# Altium PCB PCB DSI to DSI Adapter Rev-0.00.PcbDoc
Units mm, origin at the board's own origin, x right, y up, seen from the top; angles counter-clockwise.
Board outline 35.2 x 40.2 mm, 4 copper layers (Top Layer, GND, POWER, Bottom Layer), stack 1.555 mm thick; 63 components, 45 nets, 263 pads, 94 vias.
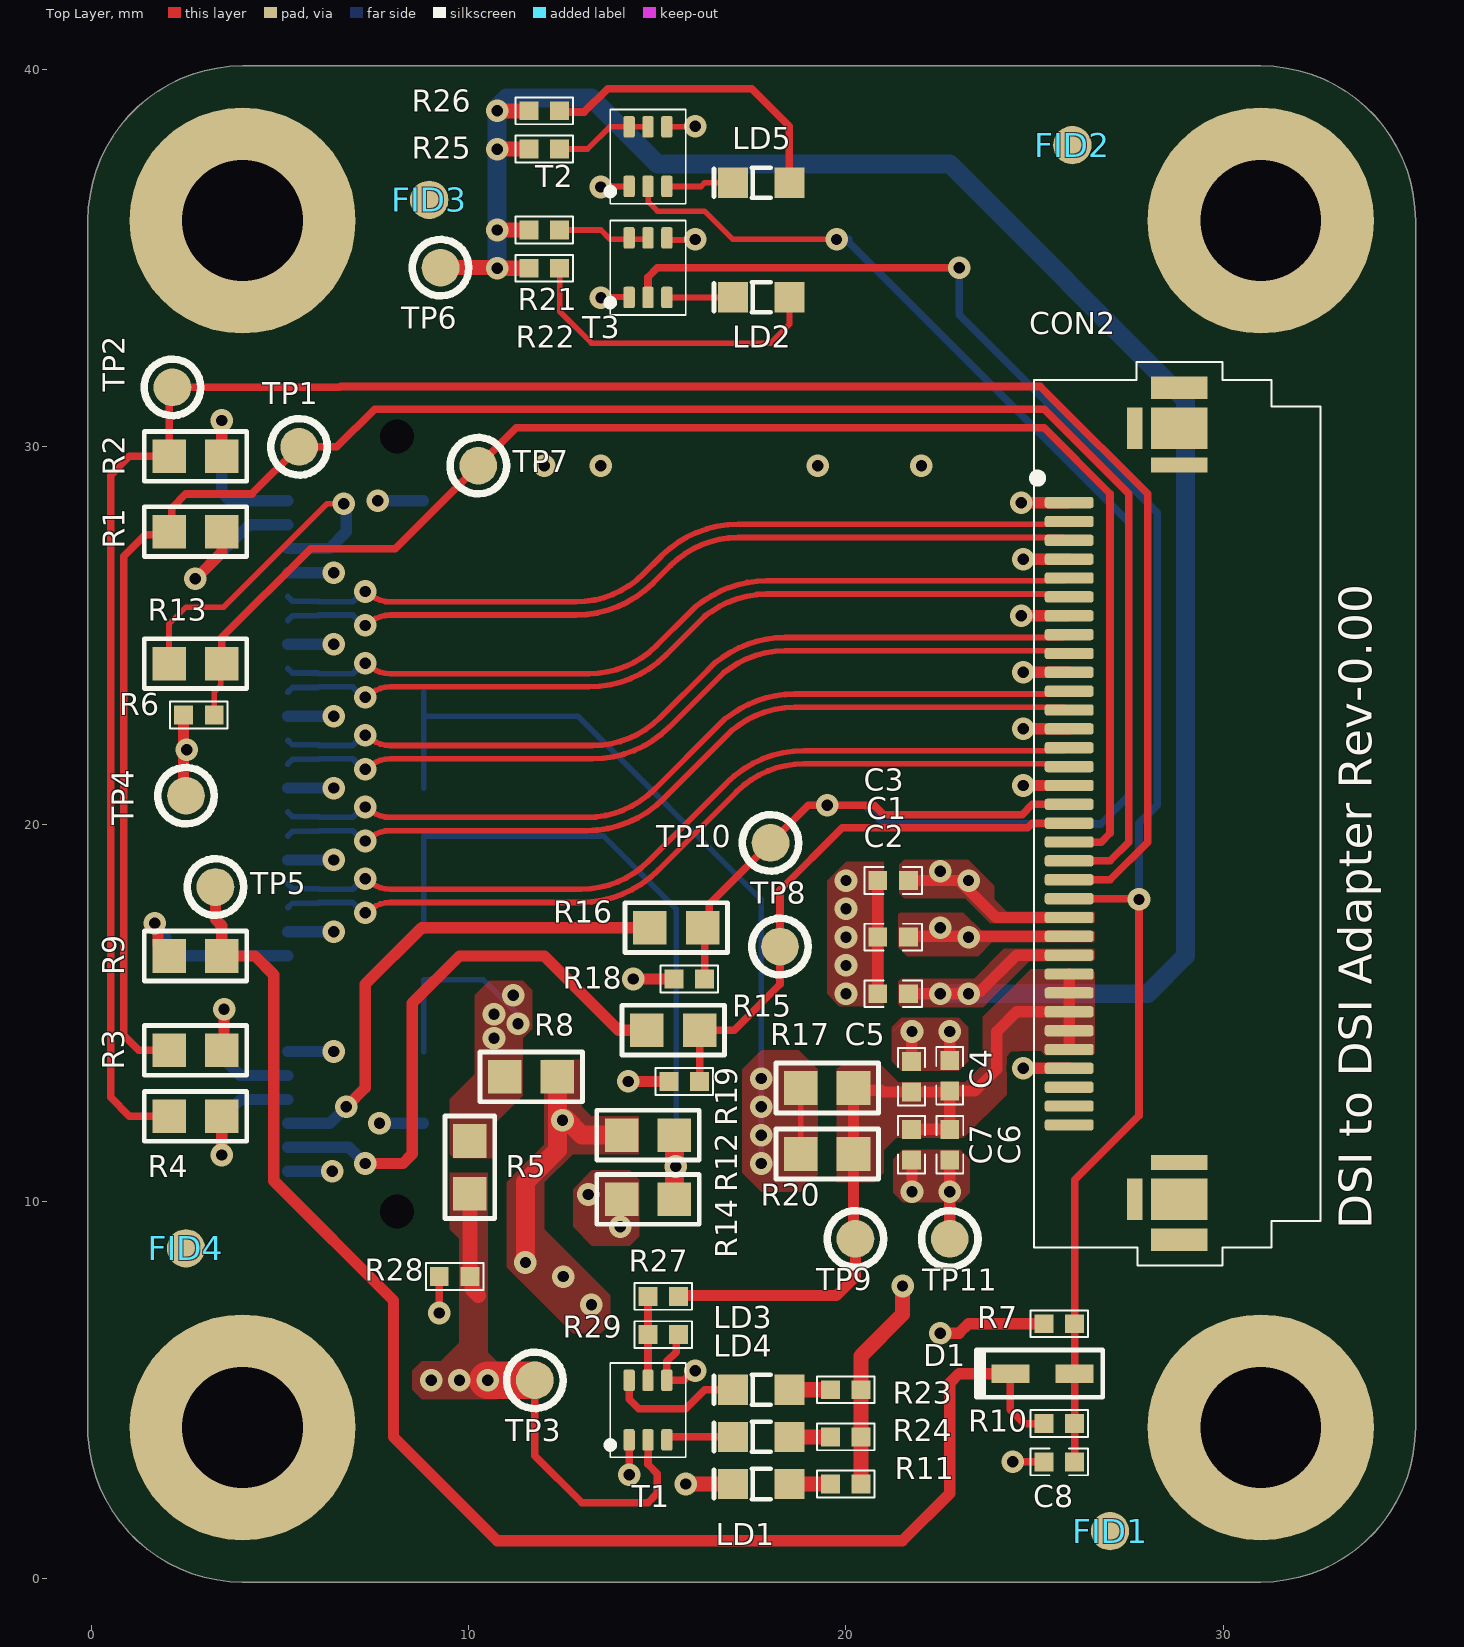
[diagram p0: Top Layer view]
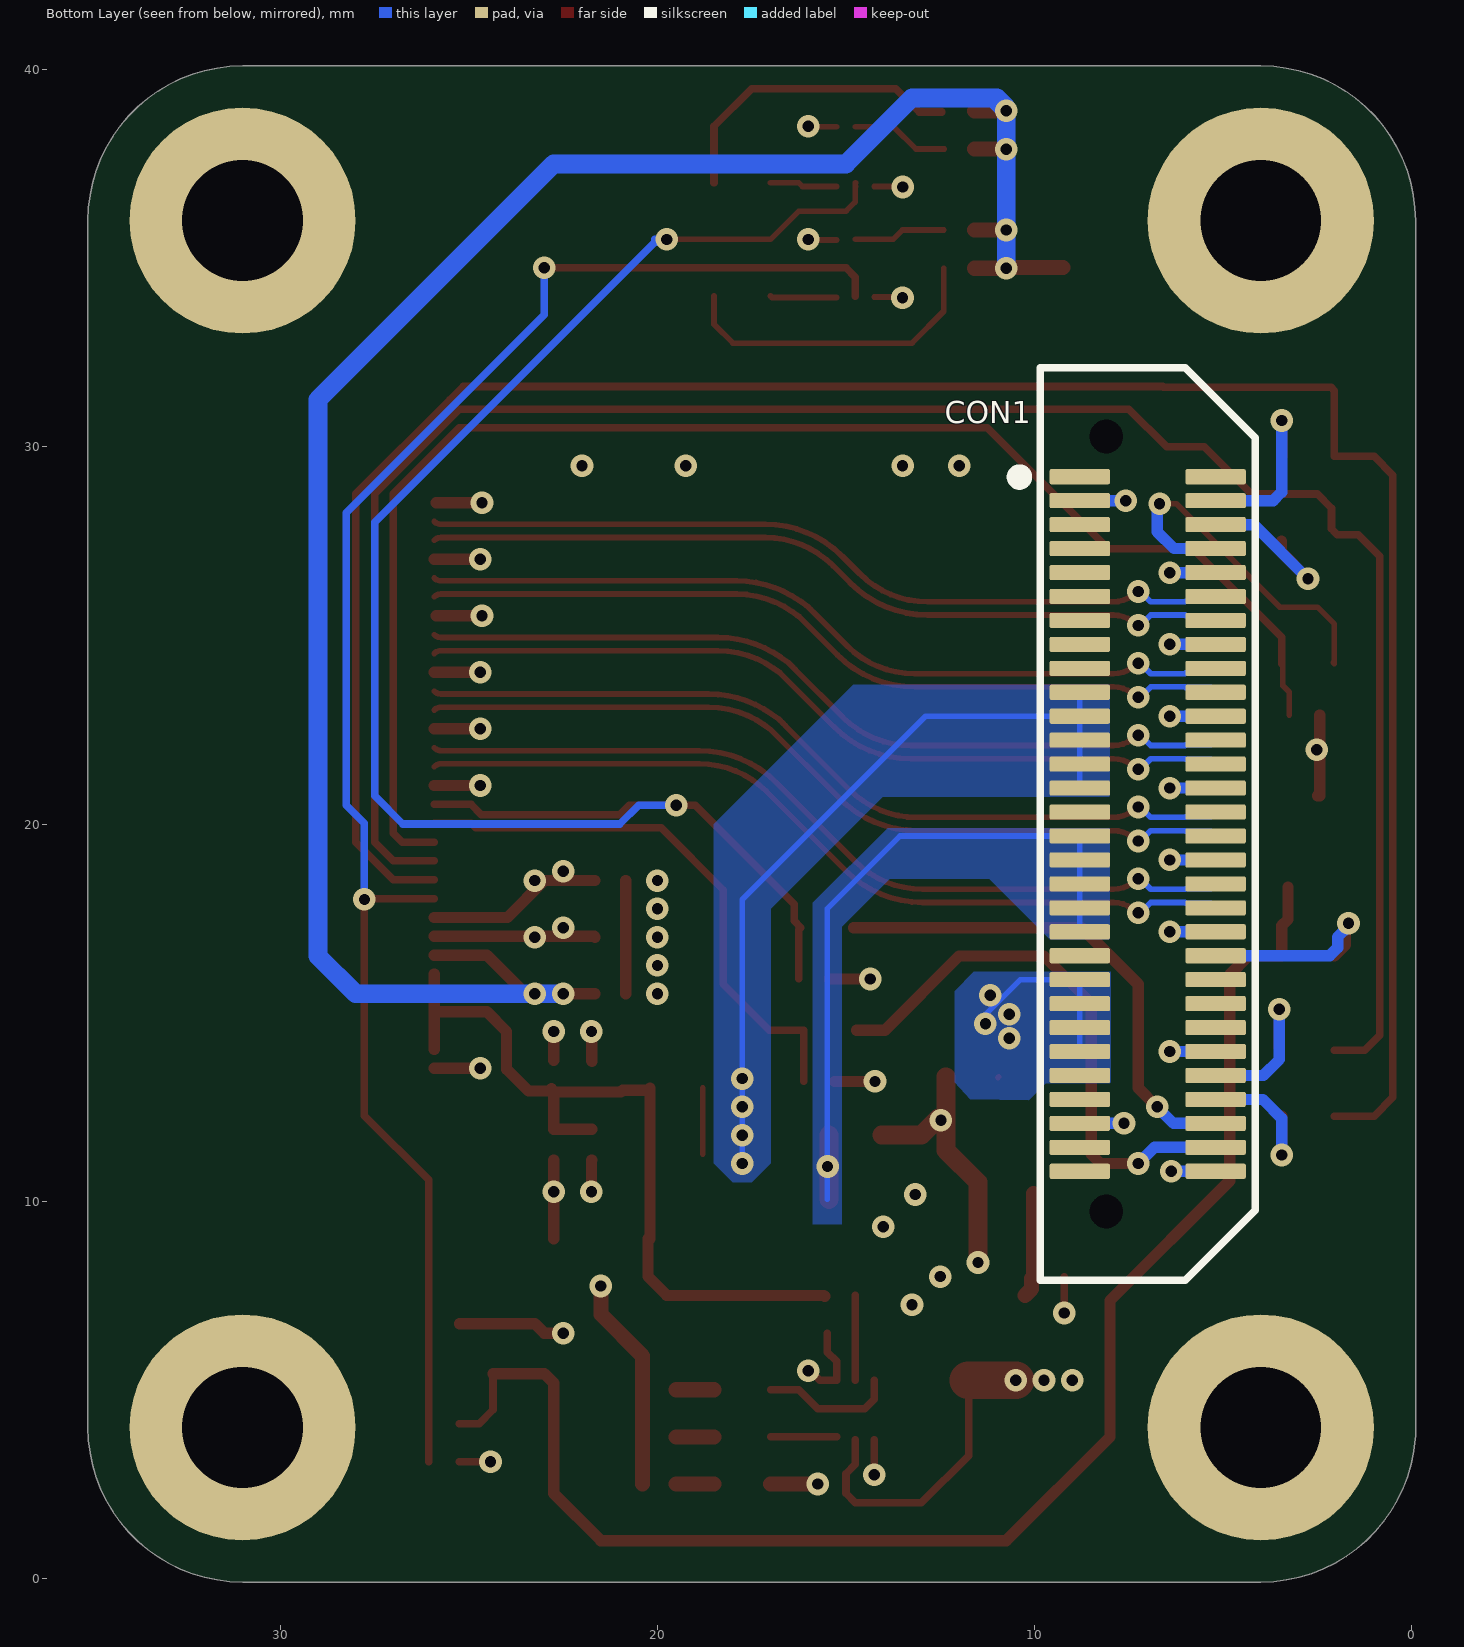
[diagram p1: Bottom Layer view, seen from below]
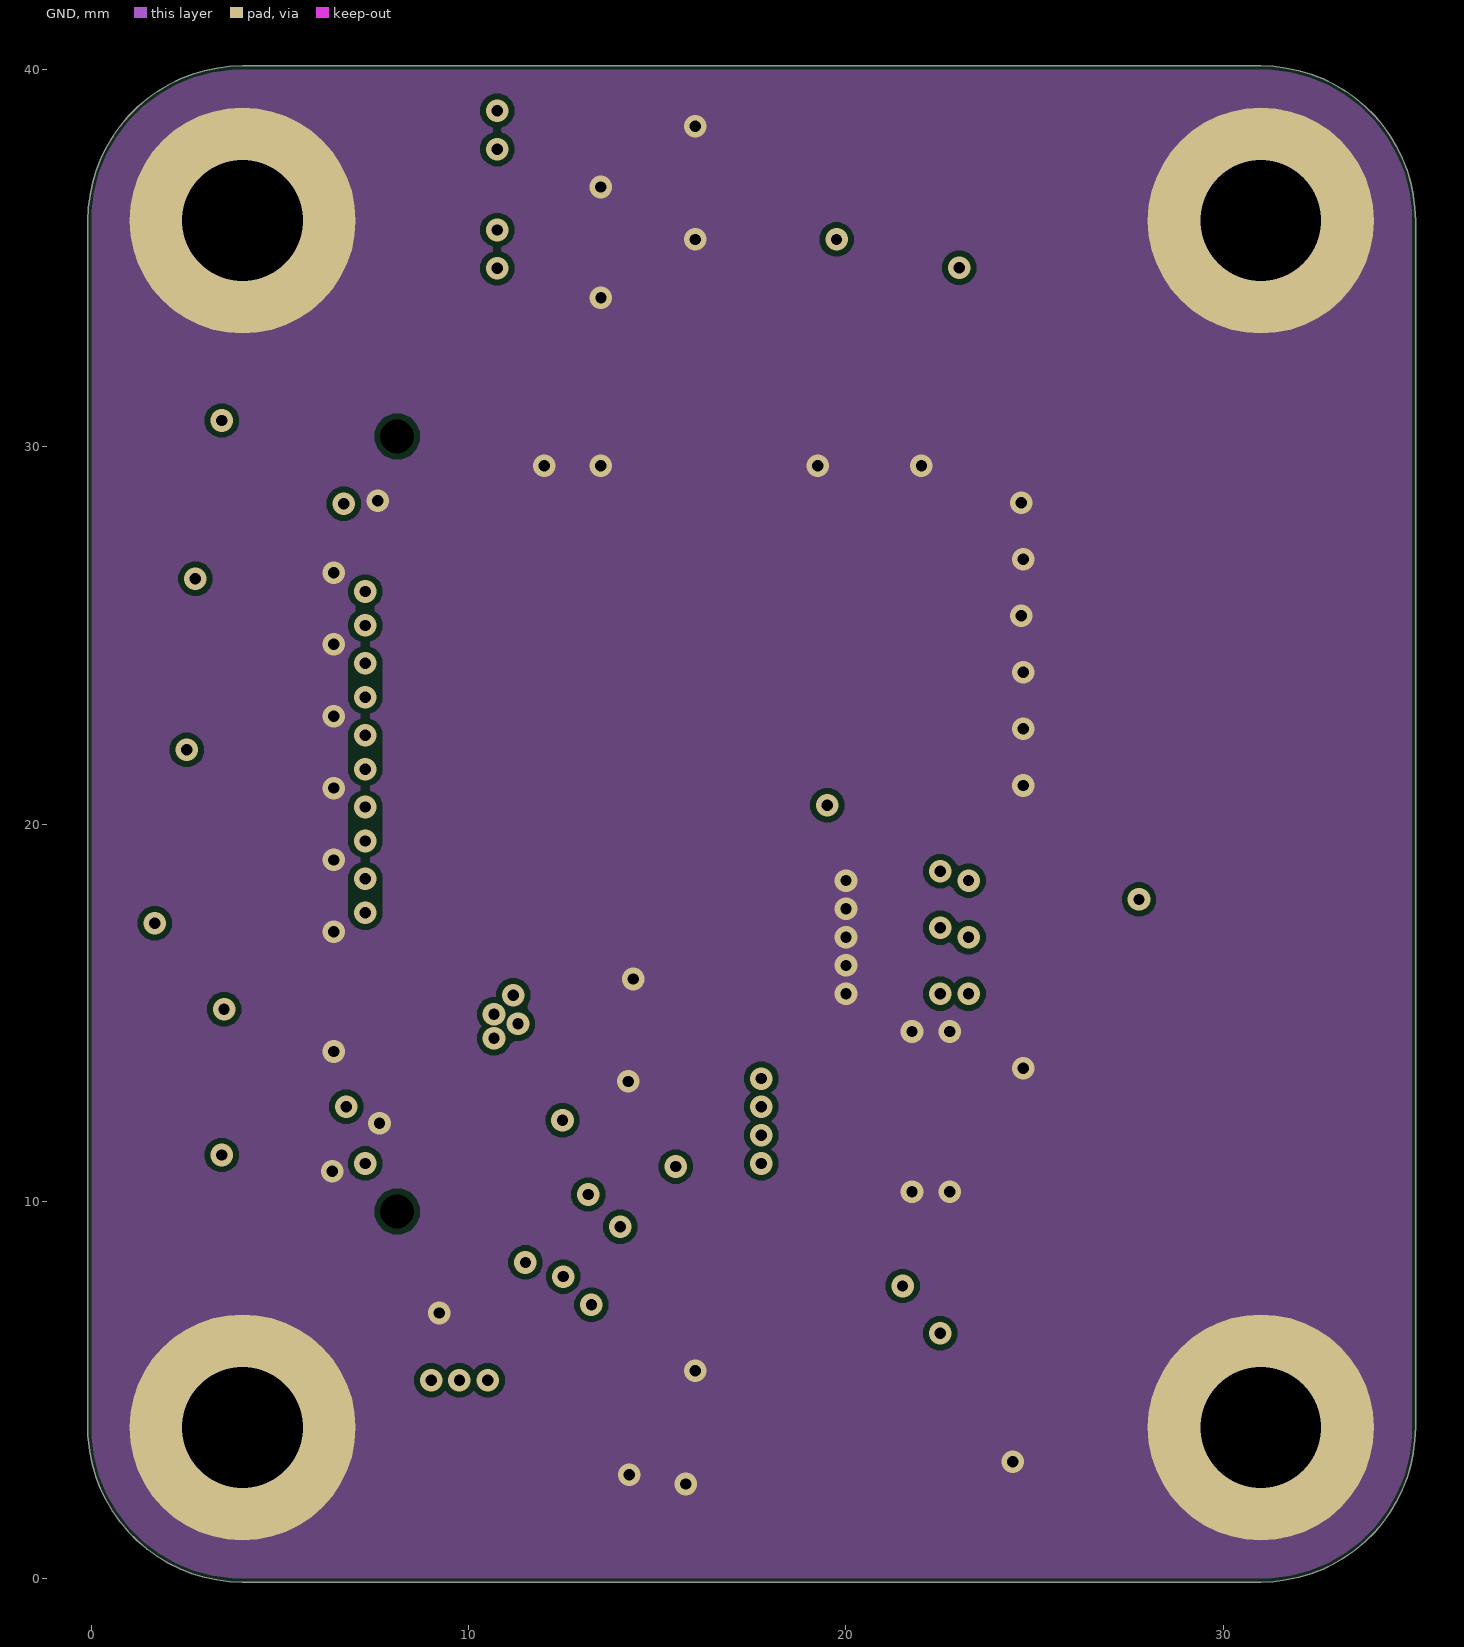
[diagram p2: GND]
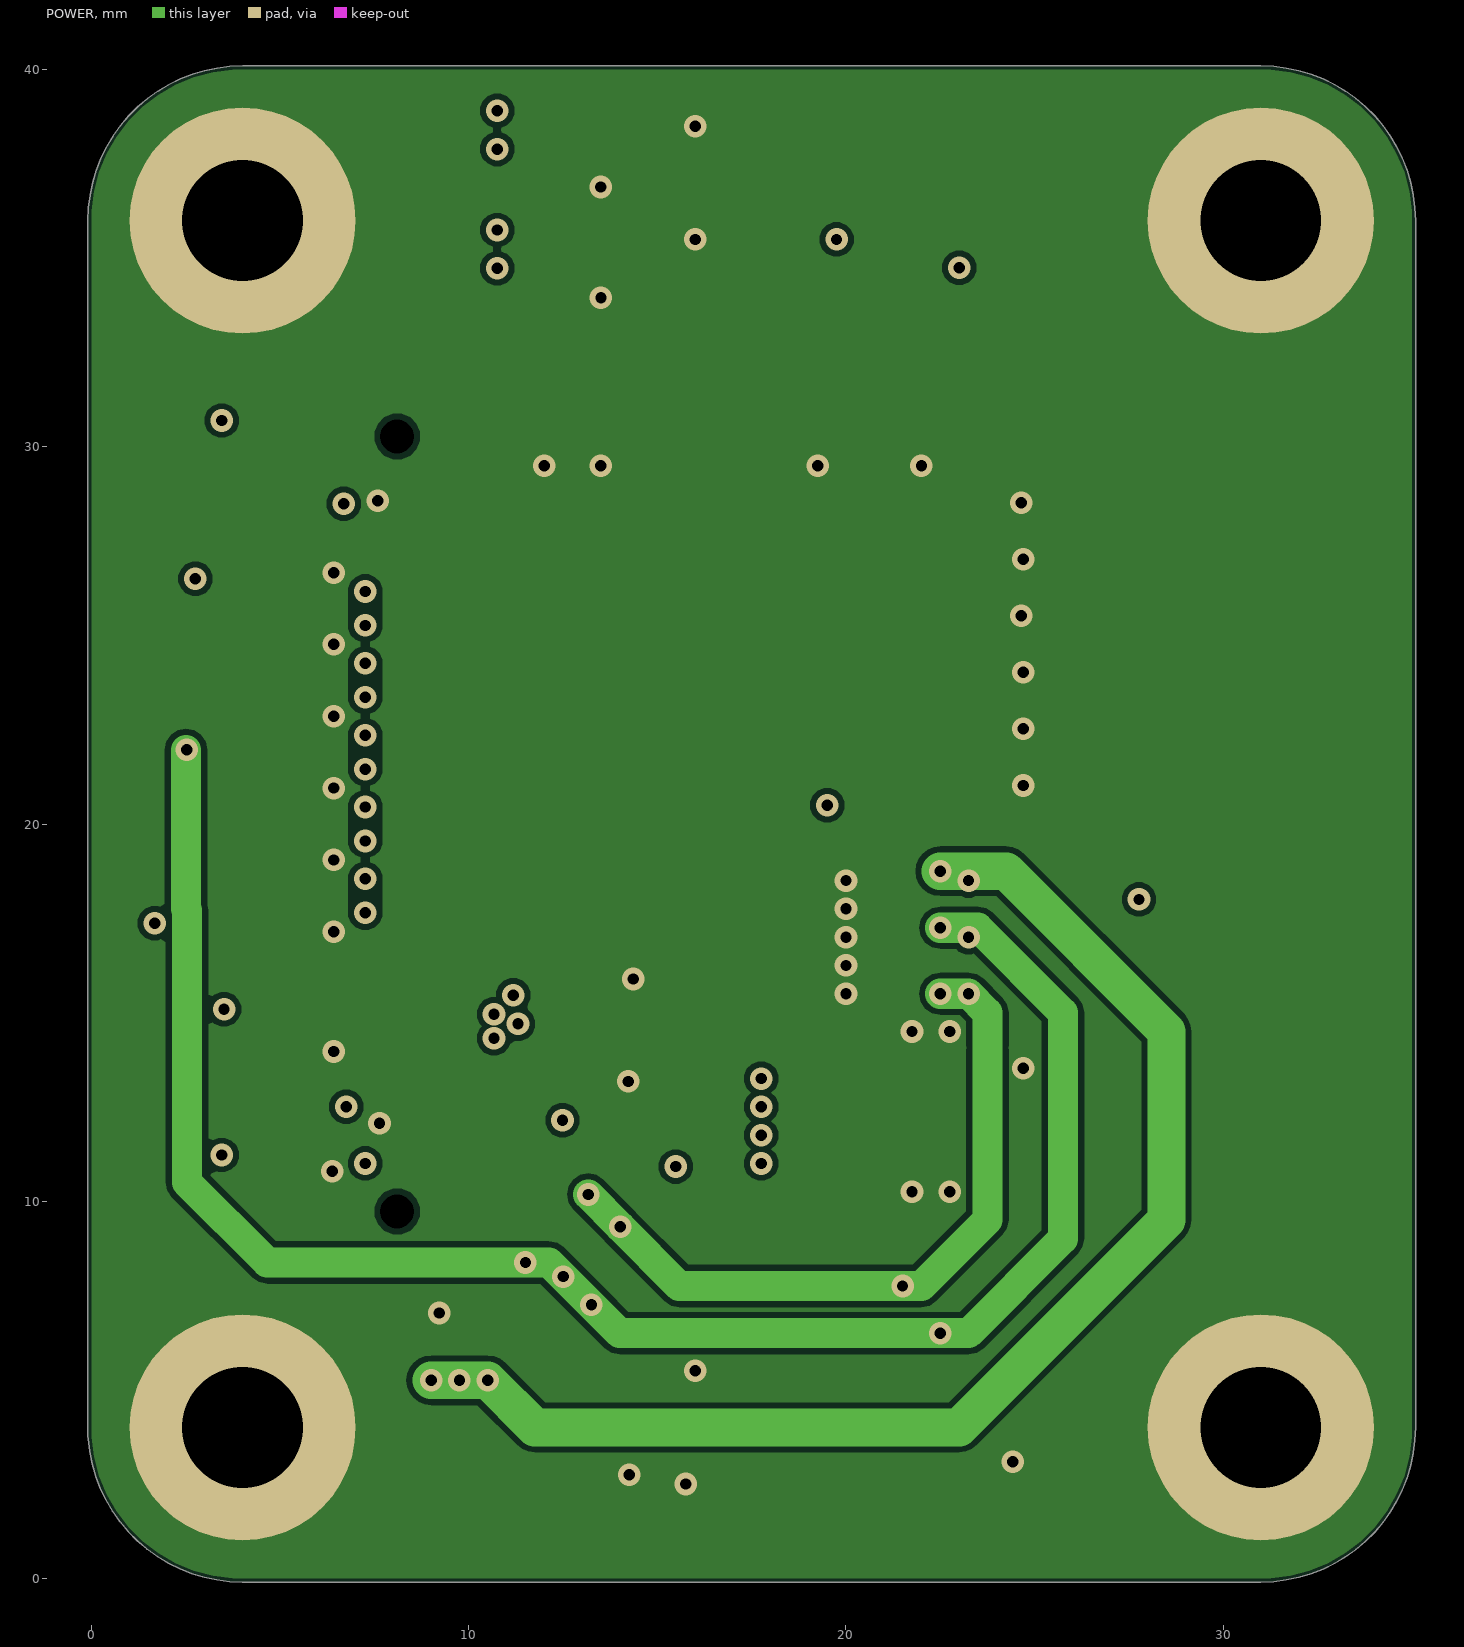
[diagram p3: POWER]
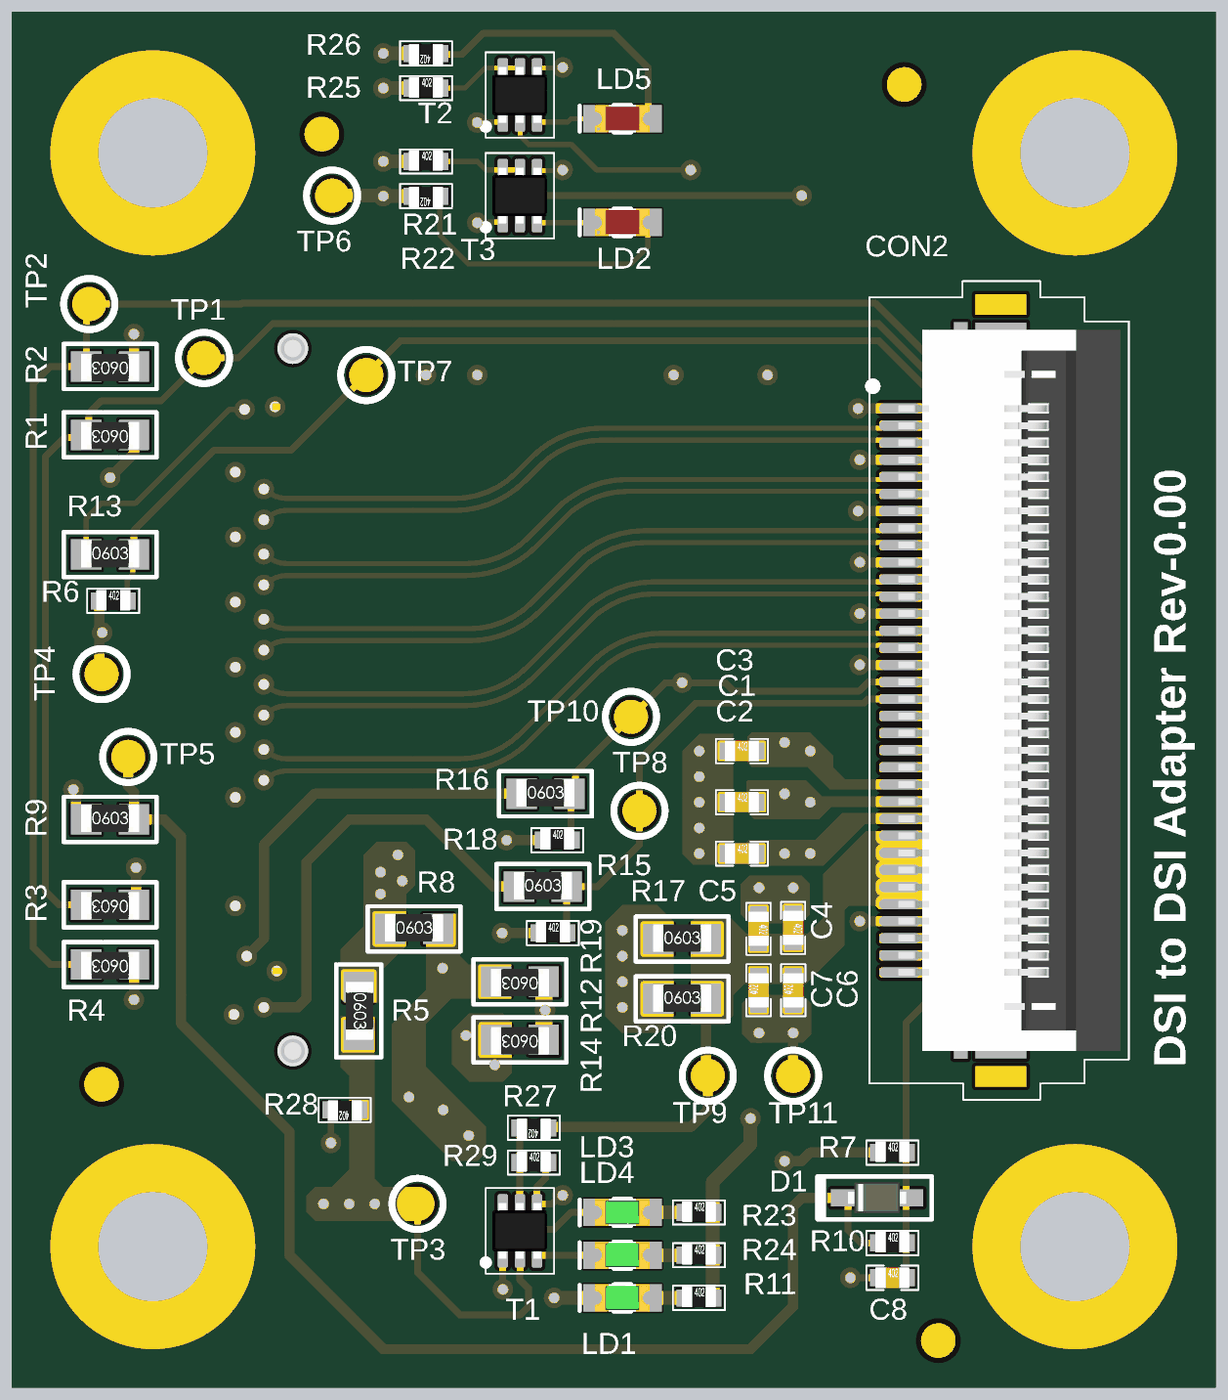
[diagram p4: 3D render of the assembled board from above, using the file's embedded part models]

## Layer stack, top to bottom
Top Solder: solder mask 0.02, Solder Resist, Dk 4.2
Top Layer: signal copper 0.043
Dielectric 2: prepreg 0.112, FR4, Dk 4.2
GND: signal copper 0.035
Dielectric 1: core 1.175, Core-041, Dk 4.8
POWER: signal copper 0.035
Dielectric 3: prepreg 0.112, FR4, Dk 4.2
Bottom Layer: signal copper 0.043
Bottom Solder: solder mask 0.02, Solder Resist, Dk 4.2

## Board outline
3.999,-0.1 cw(c4,4) -0.09,3.705 -0.1,3.75 -0.1,36 cw(c4,36) 4,40.1 31,40.1 cw(c31,36) 35.1,36 35.1,4 cw(c31,4) 31.001,-0.1 31,-0.1

## Design rules (kind name [scope] priority, off if disabled: settings)
Clearance [All] p1: gap=0.15 ignorepadtopadclearanceinfootprint=FALSE except(0.3: Via-Via)
DiffPairsRouting "Schematic Differential Pairs Routing_1" [InDifferentialPairClass('DSI')] p1: maxlimit=0.2 minlimit=0.2 mostfreqgap=0.2 toplayer_minwidth=0.15 toplayer_maxwidth=0.15 toplayer_prefwidth=0.15 midlayer1_minwidth=0.15 midlayer1_maxwidth=0.15 midlayer1_prefwidth=0.15 midlayer2_minwidth=0.15 midlayer2_maxwidth=0.15 midlayer2_prefwidth=0.15 bottomlayer_minwidth=0.15 bottomlayer_maxwidth=0.15 bottomlayer_prefwidth=0.15 maxuncoupledlength=12.7
DiffPairsRouting [InDifferentialPairClass('DSi')] p2: maxlimit=0.254 minlimit=0.254 mostfreqgap=0.254 toplayer_minwidth=0.381 toplayer_maxwidth=0.381 toplayer_prefwidth=0.381 midlayer1_minwidth=0.381 midlayer1_maxwidth=0.381 midlayer1_prefwidth=0.381 midlayer2_minwidth=0.381 midlayer2_maxwidth=0.381 midlayer2_prefwidth=0.381 bottomlayer_minwidth=0.381 bottomlayer_maxwidth=0.381 bottomlayer_prefwidth=0.381 maxuncoupledlength=12.7
HoleSize [All] p1: absolutevalues=TRUE maxlimit=5 minlimit=0.025 maxpercent=80.000 minpercent=20.000
MinimumSolderMaskSliver [All] p1: minsoldermaskwidth=0
PlaneClearance [All] p1: clearance=0.3
PlaneConnect [All] p1: planeconnectstyle=Direct reliefexpansion=0.508 reliefentries=4 reliefconductorwidth=0.254 reliefairgap=0.254
PolygonConnect [All] p1: connectstyle=Direct reliefconductorwidth=0.254 reliefentries=4 polygonreliefangle="90 Angle" airgapwidth=0.254
RoutingVias "Schematic Routing Via Style_1" [InDifferentialPairClass('DSI')] p1: holewidth=0.3 width=0.6 viastyle="Through Hole" minholewidth=0.3 minwidth=0.6 maxholewidth=0.3 maxwidth=0.6
RoutingVias [All] p2: holewidth=0.3 width=0.6 viastyle="Through Hole" minholewidth=0.3 minwidth=0.6 maxholewidth=0.3 maxwidth=0.6
SilkToSilkClearance [All] p1: silktosilkclearance=0
SilkToSolderMaskClearance [IsPad] p1: minsilkscreentomaskgap=0 clearancetoexposedcopper=TRUE
SolderMaskExpansion [All] p1: expansion=0.102 istentingtop=FALSE
SupplyNets "Schematic Supply Nets_7" [InNet('+V1.8_SW')] p1: voltage=0.000
SupplyNets "Schematic Supply Nets_6" [InNet('GND')] p2: voltage=0.000
SupplyNets "Schematic Supply Nets_5" [InNet('+V5_SW')] p3: voltage=0.000
SupplyNets "Schematic Supply Nets_4" [InNet('IO_VREF')] p4: voltage=0.000
SupplyNets "Schematic Supply Nets_3" [InNet('+V5_SW_DSI')] p5: voltage=0.000
SupplyNets "Schematic Supply Nets_2" [InNet('+V3.3_SW_DSI')] p6: voltage=0.000
SupplyNets "Schematic Supply Nets_1" [InNet('+V3.3_SW')] p7: voltage=0.000
SupplyNets "Schematic Supply Nets" [InNet('+V1.8_SW_DSI')] p8: voltage=0.000
Width [All] p1: maxlimit=2 minlimit=0.15 preferedwidth=0.3
23 further rules are at their usual default settings.

## Classes and differential pairs
differential pair class DSi: DSI_1_CLK DSI_1_D0 DSI_1_D1 DSI_1_D2 DSI_1_D3
net class I2C_2_DSI[0..1]: I2C_2_DSI0 I2C_2_DSI1
net class I2C_1[0..1]: I2C_10 I2C_11
net class DSI_CTRL_SODIMM[0..2]: DSI_CTRL_SODIMM0 DSI_CTRL_SODIMM1 DSI_CTRL_SODIMM2
net class DSI_1[0..9]: DSI_10 DSI_11 DSI_12 DSI_13 DSI_14 DSI_15 DSI_16 DSI_17 DSI_18 DSI_19
differential pair DSI_1_D3: +DSI_1_D3_P -DSI_1_D3_N
differential pair DSI_1_D2: +DSI_1_D2_P -DSI_1_D2_N
differential pair DSI_1_D1: +DSI_1_D1_P -DSI_1_D1_N
differential pair DSI_1_D0: +DSI_1_D0_P -DSI_1_D0_N
differential pair DSI_1_CLK: +DSI_1_CLK_P -DSI_1_CLK_N

## Components (designator, comment, footprint, x,y, rotation, side; value= is the part's Value field where it differs from the comment)
C1 "100nF" CAP_0402 21.25,17 r0 top
C2 "100nF" CAP_0402 21.25,15.5 r0 top
C3 "100nF" CAP_0402 21.25,18.5 r0 top
C4 "100nF" CAP_0402 22.75,13.326 r270 top
C5 "100nF" CAP_0402 21.735,13.299 r270 top
C6 "100nF" CAP_0402 22.753,11.498 r90 top
C7 "100nF" CAP_0402 21.737,11.498 r90 top
C8 "100nF" CAP_0402 25.656,3.089 r0 top
CON1 "LSS-130-03-L-DV-A-K-TR" CON-SAMTEC-LSS-130-03-L-DV-A-ADAPTER 7,20 r90 bottom locked
CON2 "DSI Connnector" CON-PLG-FPC_34X1-19-RA-BC-SMD 27.349,20.272 r90 top locked
D1 "BAT54XV2T5G" DIO_SOD523 25.21,5.427 r0 top
FID1 "FID_1MM_SMALL" FID_40X52D 27.3,1.55 r90 top
FID2 "FID_1MM_SMALL" FID_40X52D 26.3,38.3 r90 top
FID3 "FID_1MM_SMALL" FID_40X52D 9.25,36.25 r0 top
FID4 "FID_1MM_SMALL" FID_40X52D 2.8,9.05 r90 top
LD1 "LED_green" LED_0603_GREEN 17.75,2.5 r180 top value=GREEN
LD2 "LED_red" LED_0603_RED 17.75,33.968 r180 top value=RED
LD3 "LED_green" LED_0603_GREEN 17.75,5 r180 top value=GREEN
LD4 "LED_green" LED_0603_GREEN 17.75,3.75 r180 top value=GREEN
LD5 "LED_red" LED_0603_RED 17.75,37 r180 top value=RED
R1 "0R" RES_0603 2.75,27.75 r180 top
R2 "0R" RES_0603 2.75,29.75 r180 top
R3 "0R" RES_0603 2.75,14 r180 top
R4 "0R" RES_0603 2.75,12.25 r180 top
R5 "0R" RES_0603 10.029,10.896 r270 top
R6 "10K" RES_0402 2.843,22.891 r0 top
R7 "10K" RES_0402 25.656,6.75 r0 top
R8 "0R" RES_0603 11.651,13.297 r0 top
R9 "0R" RES_0603 2.75,16.5 r0 top
R10 "10K" RES_0402 25.656,4.104 r0 top
R11 "1K" RES_0402 19.991,2.5 r0 top
R12 "0R" RES_0603 14.75,11.75 r180 top
R13 "0R" RES_0603 2.75,24.25 r0 top
R14 "0R" RES_0603 14.75,10.048 r180 top
R15 "0R" RES_0603 15.422,14.533 r0 top
R16 "0R" RES_0603 15.5,17.25 r0 top
R17 "0R" RES_0603 19.5,13 r0 top
R18 "10K" RES_0402 15.843,15.891 r0 top
R19 "10K" RES_0402 15.714,13.174 r0 top
R20 "0R" RES_0603 19.5,11.25 r0 top
R21 "10K" RES_0402 12,35.75 r0 top
R22 "1K" RES_0402 12,34.735 r180 top
R23 "1K" RES_0402 19.991,5 r0 top
R24 "1K" RES_0402 19.991,3.75 r0 top
R25 "10K" RES_0402 12,37.894 r0 top
R26 "1K" RES_0402 12,38.91 r180 top
R27 "10K" RES_0402 15.156,7.475 r180 top
R28 "10K" RES_0402 9.622,8 r180 top
R29 "10K" RES_0402 15.156,6.46 r0 top
T1 "T-ONSemi-NTZD3154NT1G" SOTFL50P160X60-6N 14.75,4.46 r90 top
T2 "T-ONSemi-NTZD3154NT1G" SOTFL50P160X60-6N 14.75,37.695 r90 top
T3 "T-ONSemi-NTZD3154NT1G" SOTFL50P160X60-6N 14.75,34.75 r90 top
TP1 "TP_25MILC" T_TP-SMD 5.5,30 r0 top
TP2 "TP_25MILC" T_TP-SMD 2.14,31.578 r90 top
TP3 "TP_25MILC" T_TP-SMD 11.75,5.25 r0 top
TP4 "TP_25MILC" T_TP-SMD 2.5,20.75 r0 top
TP5 "TP_25MILC" T_TP-SMD 3.281,18.328 r0 top
TP6 "TP_25MILC" T_TP-SMD 9.25,34.75 r0 top
TP7 "TP_25MILC" T_TP-SMD 10.25,29.5 r90 top
TP8 "TP_25MILC" T_TP-SMD 18.25,16.75 r0 top
TP9 "TP_25MILC" T_TP-SMD 20.25,9 r0 top
TP10 "TP_25MILC" T_TP-SMD 18,19.5 r0 top
TP11 "TP_25MILC" T_TP-SMD 22.75,9 r90 top

## Footprints (in the part's own frame and the unit in brackets; to place one, negate y for a bottom-side part, rotate by r counter-clockwise, add the part's x,y. Pads: shape width x height; smd on the part's side, far side on the other; paste and mask are expansions set on the pad)
CAP_0402 [mm] "Capacitor"
  rect 0.5x0.5 smd mask+0.051: 1(-0.406,0) 2(0.406,0)
  silkscreen extent -0.76,-0.36 0.76,0.36, body extent -0.5,-0.3 0.5,0.3, height 0.2
CON-PLG-FPC_34X1-19-RA-BC-SMD [mm] "687134149022, CF25341D0R0-05-NH, 541323462, 541323433, 512963494, FH34SRJ-34S-0.5SH(50)"
  rect 0.5x0.3 on Top Paste: 0(-9.975,-0.307) 0(9.975,-0.307)
  rrect50% 0.3x1.3 smd paste-1: 1(8.25,1.432) 2(7.75,1.432) 3(7.25,1.432) 4(6.75,1.432) 5(6.25,1.432) 6(5.75,1.432) 7(5.25,1.432) 8(4.75,1.432) 9(4.25,1.432) 10(3.75,1.432) 11(3.25,1.432) 12(2.75,1.432) 13(2.25,1.432) 14(1.75,1.432) 15(1.25,1.432) 16(0.75,1.432) 17(0.25,1.432) 18(-0.25,1.432) 19(-0.75,1.432) 20(-1.25,1.432) 21(-1.75,1.432) 22(-2.25,1.432) 23(-2.75,1.432) 24(-3.25,1.432) 25(-3.75,1.432) 26(-4.25,1.432) 27(-4.75,1.432) 28(-5.25,1.432) 29(-5.75,1.432) 30(-6.25,1.432) 31(-6.75,1.432) 32(-7.25,1.432) 33(-7.75,1.432) 34(-8.25,1.432)
  rect 0.6x1.5 smd paste-1: S1(-11.293,-1.482) S2(11.293,-1.482)
  rect 1.1x0.4 smd paste+0: S1(-10.225,-0.307) S2(10.225,-0.307)
  rect 1.1x1.5 smd: S1(-10.218,-1.482) S2(10.218,-1.482)
  rect 0.4x1.5 smd: S1(-9.25,-1.482) S2(9.25,-1.482)
  oval 0.3x1.2 on Top Paste: ""(-8.25,1.482) ""(-7.75,1.482) ""(-7.25,1.482) ""(-6.75,1.482) ""(-6.25,1.482) ""(-5.75,1.482) ""(-5.25,1.482) ""(-4.75,1.482) ""(-4.25,1.482) ""(-3.75,1.482) ""(-3.25,1.482) ""(-2.75,1.482) ""(-2.25,1.482) ""(-1.75,1.482) ""(-1.25,1.482) ""(-0.75,1.482) ""(-0.25,1.482) ""(0.25,1.482) ""(0.75,1.482) ""(1.25,1.482) ""(1.75,1.482) ""(2.25,1.482) ""(2.75,1.482) ""(3.25,1.482) ""(3.75,1.482) ""(4.25,1.482) ""(4.75,1.482) ""(5.25,1.482) ""(5.75,1.482) ""(6.25,1.482) ""(6.75,1.482) ""(7.25,1.482) ""(7.75,1.482) ""(8.25,1.482)
  silkscreen extent -11.98,-5.23 11.97,2.37, body extent -10.55,-4.98 10.55,1.52, height 2.3
CON-SAMTEC-LSS-130-03-L-DV-A-ADAPTER [mm] "0.635 mm Razor Beam High-Speed Hermaphroditic Terminal/Socket Strip"
  rrect20% 0.4x1.6 smd: 1(9.207,1.8) 2(9.207,-1.8) 3(8.572,1.8) 4(8.572,-1.8) 5(7.938,1.8) 6(7.938,-1.8) 7(7.302,1.8) 8(7.302,-1.8) 9(6.667,1.8) 10(6.667,-1.8) 11(6.032,1.8) 12(6.032,-1.8) 13(5.397,1.8) 14(5.397,-1.8) 15(4.763,1.8) 16(4.763,-1.8) 17(4.127,1.8) 18(4.127,-1.8) 19(3.492,1.8) 20(3.492,-1.8) 21(2.857,1.8) 22(2.857,-1.8) 23(2.222,1.8) 24(2.222,-1.8) 25(1.588,1.8) 26(1.587,-1.8) 27(0.953,1.8) 28(0.952,-1.8) 29(0.318,1.8) 30(0.317,-1.8) 31(-0.317,1.8) 32(-0.318,-1.8) 33(-0.952,1.8) 34(-0.953,-1.8) 35(-1.587,1.8) 36(-1.588,-1.8) 37(-2.222,1.8) 38(-2.222,-1.8) 39(-2.857,1.8) 40(-2.857,-1.8) 41(-3.492,1.8) 42(-3.492,-1.8) 43(-4.127,1.8) 44(-4.127,-1.8) 45(-4.763,1.8) 46(-4.763,-1.8) 47(-5.397,1.8) 48(-5.397,-1.8) 49(-6.032,1.8) 50(-6.032,-1.8) 51(-6.667,1.8) 52(-6.667,-1.8) 53(-7.302,1.8) 54(-7.302,-1.8) 55(-7.938,1.8) 56(-7.938,-1.8) 57(-8.572,1.8) 58(-8.572,-1.8) 59(-9.207,1.8) 60(-9.207,-1.8)
  round 0 hole 0.9 unplated mask+0.55: ""(-10.275,1.1) ""(10.275,1.1)
  silkscreen extent -12.1,-2.85 12.1,3.49, body extent -11.9,-2.3 11.9,2.3, height 5.46
DIO_SOD523 [mm] "DIODE"
  rect 1x0.49 smd: A(0.85,0) K(-0.85,0)
  silkscreen extent -1.75,-0.63 1.6,0.63, body extent -0.85,-0.45 0.85,0.45, height 0.8
FID_40X52D [mm]
  round 1.016 smd paste-1.016 mask+0.15: 1(-0.3,0.3)
LED_0603_GREEN [mm]
  rect 0.8x0.8 smd mask+0.05: 1(-0.75,0) 2(0.75,0)
  silkscreen extent -0.25,-0.4 1.25,0.4, body extent -0.8,-0.4 0.8,0.4, height 0.6
LED_0603_RED [mm]
  rect 0.8x0.8 smd mask+0.05: 1(-0.75,0) 2(0.75,0)
  silkscreen extent -0.25,-0.4 1.25,0.4, body extent -0.8,-0.4 0.8,0.4, height 0.6
RES_0402 [mm]
  rect 0.5x0.5 smd mask+0.051: 1(-0.406,0) 2(0.406,0)
  silkscreen extent -0.76,-0.36 0.76,0.36, body extent -0.5,-0.27 0.5,0.33, height 0.2
RES_0603 [mil] "CASE: 0603"
  rect 35x35 smd mask+3: 1(-27.5,0) 2(27.5,0)
  silkscreen extent -54,-26 54,26, body extent -33,-15 33,17, height 22
SOTFL50P160X60-6N [mm] "Dual N-Channel 20V (D-S)  MOSFET"
  rrect35% 0.57x0.3 smd: 1(-0.79,0.5) 2(-0.79,0) 3(-0.79,-0.5) 4(0.79,-0.5) 5(0.79,0) 6(0.79,0.5)
  silkscreen extent -1.25,-1 1.25,1.08, body extent -0.81,-0.8 0.81,0.8, height 0.58
T_TP-SMD [mm]
  round 1 smd paste-0.5: 1(0,0)
  silkscreen extent -0.75,-0.75 0.75,0.75

## Part data
C1 C2 C3 C4 C5 C6 C7 C8: library part CAP_100nF-25V-10%-0402, "0.1µF ±10% 25V Ceramic Capacitor X7R 0402 (1005 Metric)", Case/Package=0402, Manufacturer="Walsin Technology Corporation", Manufacturer Part Number=0402B104K250CT, Supplier-1=Digikey
CON1: library part CON-Samtec-LSS-130-03-L-DV-A-K-TR-ADAPTER, "60 Position Connector, Self Mating, Non-Gendered, Surface Mount", Manufacturer Name=Samtec, Manufacturer Part No.=LSS-130-03-L-DV-A-K-TR, No. of ways=60, Pitch=0.635mm
CON2: library part CON-PLG-FPC_34X1-19-RA-BC-SMD, "34 Position FFC, FPC Connector Contacts, 0.020\" (0.50mm) Surface Mount, Right Angle FFC & FPC Connectors 0.5 FPC EASYON BTM CONT RA 30CKT ZIF"
D1: library part DIO-BAT54XV2T5G, "Schottky Barrier Rectifier", Case/Package=SOD523, Manufacturer="Diodes Incorporated", Manufacturer Part Number=BZT52C3V3T-7, Supplier-1=Digikey
FID1 FID2 FID3 FID4: "Fiducial 40mil Diameter, 52mil Mask", Supplier=Digikey
LD1 LD3 LD4: "LED, Green, 0603", Manufacturer=EVERLIGHT, Manufacturer_Part_Number=19-213SYGC/S530-E2/TR8, Package="LED 0603", ComponentLink1Description=Datasheet, ComponentLink1URL=http://tunmcdsvn.tun.st.com/Component_Datasheet_Library/Trunk/Display/Everlight_SMD-LED-GREEN_19-213SYGC-S530-XX-TR8-v3.doc, ECCN_EU=NEC, ECCN_US=EAR99, Internal_Part_Number=MCD-00050, Part_Type=Display, Provided_By=SUBCO, Status=Released
LD2 LD5: "LED, Red, 0603", Manufacturer=EVERLIGHT, Manufacturer_Part_Number=19-213-R6C-AP1Q2B/3T, Package="LED 0603", ComponentLink1Description=Datasheet, ComponentLink1URL=http://tunmcdsvn.tun.st.com/Component_Datasheet_Library/Trunk/Display/Everlight_SMD-LED-RED_19-213-R6C-AP1Q2B-3T-V3.doc, ECCN_EU=NEC, ECCN_US=EAR99, Internal_Part_Number=MCD-00049, Part_Type=Display, Provided_By=SUBCO, Status=Released
R1 R2 R3 R4 R5 R8 R9 R12 R13 R14 R15 R16 R17 R20: library part RES_0R-0.1W-1%-0603, "0 Ohms Jumper 0.1W, 1/10W Chip Resistor 0603 (1608 Metric) Thick Film", Case/Package=0603, Manufacturer=Yageo, Manufacturer Part Number=RC0603JR-070RL, Supplier-1=Digikey
R6 R7 R10 R18 R19 R21 R25 R27 R28 R29: library part RES_10K-0.1W-1%-0402, "10 kOhms ±1% 0.1W, 1/10W Chip Resistor 0402 (1005 Metric) Anti-Sulfur Thin Film", Case/Package=0402, Manufacturer="Vishay Beyschlag/Draloric/BC Components", Manufacturer Part Number=MCS04020C1002FE000, Supplier-1=Digikey
R11 R22 R23 R24 R26: library part RES_1K-0.1W-1%-0402, "1 kOhms ±1% 0.1W, 1/10W Chip Resistor 0402 (1005 Metric) Anti-Sulfur Thin Film", Case/Package=0402, Manufacturer="Vishay Beyschlag/Draloric/BC Components", Manufacturer Part Number=MCS04020C1001FE000, Supplier-1=Digikey
T1 T2 T3: "Dual N-Channel 20V (D-S)  MOSFET", Manufacturer Name=ONSemi, Manufacturer Part No.=NTZD3154NT1G
TP1 TP2 TP3 TP4 TP5 TP6 TP7 TP8 TP9 TP10 TP11: "Test Point 25mil"

## Free pads (board coordinates)
  round 6 hole 3.2 mask+0: MH(4,4) MH(4,36) MH(31,4) MH(31,36)

## Via types
v1: diameter 0.6, hole 0.3, Top Layer to Bottom Layer, tented both sides, 94 vias

## Nets (pads, with @x,y where several pads share a name; then routed paths per layer and width w, separated by ;. In a path a pad name is that pad's centre, name@x,y a point inside that pad or via, vN(x,y) a via of type N, cw(c..) or ccw(c..) an arc to the next point about the centre after c; other vN are vias at no path point)
+V1.8_SW: CON1.43 CON1.45 CON1.47 CON1.49 CON1.51 R5.1 R8.1 | length 5.1
  Top Layer w0.15: R8.1 R8.1@10.971,13.279
  Bottom Layer w0.15: CON1.49 CON1.47 CON1.45 CON1.43 10.377,15.873 v1@11.5,14.75
  other v1: 10.668,14.319 11.303,14.7 10.668,14.954 11.176,15.462
+V1.8_SW_DSI: C3.2 CON2.23 R5.2 R28.1 T1.2 TP3.1 | length 51.2
  Top Layer w0.2: TP3.1 11.75,3.25 13,2 14.75,2 15,2.25 15,2.778 14.75,3.028 14.75,3.241 14.754,3.246 14.754,3.666 T1.2
  Top Layer w0.3: C3.2 23,18.5 23.978,17.522 CON2.23
  Top Layer w0.4: R5.2 R28.1 10.079,7.95 10.079,7.671 10.25,7.5
  Top Layer w1: v1(10.5,5.25) TP3.1
  POWER w1: v1(9,5.25) v1(9.75,5.25) v1(10.5,5.25) 11.75,4 23,4 28.5,9.5 28.5,14.5 24.25,18.75 v1(22.5,18.75)
  other v1: 23.25,18.5
+V3.3_SW: CON1.31 CON1.33 CON1.35 CON1.37 CON1.39 R12.1 R14.1 | length 19.4
  Top Layer w0.5: R14.1 R12.1
  Bottom Layer w0.15: CON1.39 CON1.37 CON1.35 CON1.33 CON1.31 13.567,19.683 15.5,17.75 15.5,10.048
  other v1: 15.488,10.918
+V3.3_SW_DSI: C2.2 CON2.25 R11.2 R14.2 R21.1 R22.2 R23.2 R24.2 R25.1 R26.2 TP6.1 | length 82.6
  Top Layer w0.3: C2.2 v1(22.5,15.5) v1@23,15.5 ; v1@23.125,15.625 v1@23,15.5 ; CON2.25 24.522,16.522 23.557,15.557 23.307,15.557 v1(23.25,15.5) v1@23,15.5
  Top Layer w0.4: TP6.1 10.735,34.75 v1(10.75,34.735) R22.2 ; v1(10.75,35.75) R21.1 ; v1(10.75,37.894) R25.1 ; v1(10.75,38.91) R26.2 ; R11.2 R24.2 R23.2 20.397,5.897 21.5,7 v1(21.5,7.75)
  POWER w0.8: v1(13.167,10.177) v1@14.019,9.325 ; v1(14.012,9.319) 15.581,7.75 v1(21.5,7.75) 22,7.75 23.75,9.5 23.75,14 ; v1(22.5,15.5) v1(23.25,15.5) 23.75,15 23.75,14.129
  Bottom Layer w0.5: v1(10.75,34.735) v1(10.75,35.75) v1(10.75,37.894) v1(10.75,38.91) 10.752,38.91 11.093,39.25 ; v1@10.75,39 11,39.25 11.093,39.25 ; v1(22.5,15.5) v1(23.25,15.5) 28,15.5 29,16.5 29,31.25 22.75,37.5 15,37.5 13.25,39.25 11.093,39.25
+V5_SW: CON1.19 CON1.21 CON1.23 CON1.25 CON1.27 R17.1 R20.1 | length 22.3
  Top Layer w0.15: R20.1 R17.1
  Bottom Layer w0.15: CON1.27 CON1.25 CON1.23 CON1.21 ; CON1.19 CON1.21 ; v1(17.75,11) v1(17.75,11.75) v1(17.75,12.5) v1(17.75,13.25) 17.75,18 12.892,22.858 CON1.21
+V5_SW_DSI: C4.2 C5.2 C6.2 C7.2 CON2.26 CON2.27 CON2.28 CON2.29 CON2.30 R17.2 R20.2 R27.1 TP9.1 | length 21.2
  Top Layer w0.3: R27.1 15.588,7.5 19.75,7.5 20.25,8 TP9.1 ; TP9.1@20.198,9 R20.2 R17.2 20.257,12.942 20.917,12.942 20.966,12.893 C5.2 22.723,12.893 C4.2 ; C7.2 C6.2 22.753,12.917 C4.2 ; C4.2@22.808,12.978 C4.2 ; CON2.30 CON2.29 CON2.28 ; CON2.26 CON2.27 CON2.28 ; C4.2 23.42,12.92 24,13.5 24,14.5 24.522,15.022 CON2.28
DSI_1_CLK_N: CON1.26 CON2.9 | length 21.9
  Top Layer w0.15: v1(7.25,21.455) ccw(c7.25,21.546) 7.315,21.482 cw(c7.914,20.883) 7.914,21.73 13.278,21.73 ccw(c13.278,24.62) 15.321,22.576 16.747,24.003 16.92,24.125 cw(c18.394,22.057) 18.394,24.597 25.343,24.597 25.737,24.597 cw(c25.737,24.341) CON2.9
  Bottom Layer w0.15: CON1.26 5.325,21.713 5.995,21.713 6.013,21.73 6.92,21.73 7.195,21.455 v1(7.25,21.455)
DSI_1_CLK_P: CON1.24 CON2.8 | length 21.9
  Top Layer w0.15: v1(7.25,22.355) cw(c7.25,22.264) 7.315,22.328 ccw(c7.914,22.927) 7.914,22.08 13.278,22.08 ccw(c13.278,24.62) 15.074,22.824 16.35,24.1 16.424,24.174 ; 16.425,24.175 16.499,24.249 cw(c16.747,24.003) 16.546,24.289 16.717,24.411 cw(c18.394,22.057) 18.394,24.947 25.737,24.947 ccw(c25.737,25.203) CON2.8
  Bottom Layer w0.15: CON1.24 5.325,22.098 5.995,22.098 6.013,22.08 6.92,22.08 7.195,22.355 v1(7.25,22.355)
DSI_1_D0_N: CON1.14 CON2.3 | length 21.6
  Top Layer w0.15: v1(7.25,25.265) ccw(c7.25,25.356) 7.315,25.292 cw(c7.914,24.693) 7.914,25.54 12.838,25.54 ccw(c12.838,28.43) 14.881,26.386 15.348,26.853 cw(c17.144,25.057) 17.144,27.597 25.737,27.597 cw(c25.737,27.341) CON2.3
  Bottom Layer w0.15: CON1.14 5.325,25.523 5.995,25.523 6.013,25.54 6.92,25.54 7.195,25.265 v1(7.25,25.265)
DSI_1_D0_P: CON1.12 CON2.2 | length 21.6
  Top Layer w0.15: v1(7.25,26.165) cw(c7.25,26.074) 7.315,26.138 ccw(c7.914,26.737) 7.914,25.89 12.838,25.89 ccw(c12.838,28.43) 14.634,26.634 15.1,27.1 cw(c17.144,25.057) 17.144,27.947 25.737,27.947 ccw(c25.737,28.203) CON2.2
  Bottom Layer w0.15: CON1.12 5.325,25.908 5.995,25.908 6.013,25.89 6.92,25.89 7.195,26.165 v1(7.25,26.165)
DSI_1_D1_N: CON1.20 CON2.6 | length 21.8
  Top Layer w0.15: v1(7.25,23.36) ccw(c7.25,23.451) 7.315,23.387 cw(c7.914,22.788) 7.914,23.635 13.183,23.635 ccw(c13.183,26.525) 15.226,24.481 16.247,25.503 16.42,25.625 cw(c17.894,23.557) 17.894,26.097 25.343,26.097 25.737,26.097 cw(c25.737,25.841) CON2.6
  Bottom Layer w0.15: CON1.20 5.325,23.618 5.995,23.618 6.013,23.635 6.92,23.635 7.195,23.36 v1(7.25,23.36)
DSI_1_D1_P: CON1.18 CON2.5 | length 21.8
  Top Layer w0.15: v1(7.25,24.26) cw(c7.25,24.169) 7.315,24.233 ccw(c7.914,24.832) 7.914,23.985 13.183,23.985 ccw(c13.183,26.525) 14.979,24.729 15.85,25.6 15.924,25.674 ; 15.925,25.675 15.999,25.749 cw(c16.247,25.503) 16.046,25.788 16.217,25.911 cw(c17.894,23.557) 17.894,26.447 25.737,26.447 ccw(c25.737,26.703) CON2.5
  Bottom Layer w0.15: CON1.18 5.325,24.003 5.995,24.003 6.013,23.985 6.92,23.985 7.195,24.26 v1(7.25,24.26)
DSI_1_D2_N: CON1.32 CON2.12 | length 22.1
  Top Layer w0.15: v1(7.25,19.55) ccw(c7.25,19.641) 7.315,19.577 cw(c7.914,18.978) 7.914,19.825 13.123,19.825 ccw(c13.123,22.715) 15.166,20.671 16.997,22.503 17.17,22.625 cw(c18.644,20.557) 18.644,23.097 25.343,23.097 25.737,23.097 cw(c25.737,22.841) CON2.12
  Bottom Layer w0.15: CON1.32 5.325,19.808 5.995,19.808 6.013,19.825 6.92,19.825 7.195,19.55 v1(7.25,19.55)
DSI_1_D2_P: CON1.30 CON2.11 | length 22.1
  Top Layer w0.15: v1(7.25,20.45) cw(c7.25,20.359) 7.315,20.423 ccw(c7.914,21.022) 7.914,20.175 13.123,20.175 ccw(c13.123,22.715) 14.919,20.919 16.6,22.6 16.674,22.674 ; 16.675,22.675 16.749,22.749 cw(c16.997,22.503) 16.796,22.788 16.967,22.911 cw(c18.644,20.557) 18.644,23.447 25.737,23.447 ccw(c25.737,23.703) CON2.11
  Bottom Layer w0.15: CON1.30 5.325,20.193 5.995,20.193 6.013,20.175 6.92,20.175 7.195,20.45 v1(7.25,20.45)
DSI_1_D3_N: CON1.38 CON2.15 | length 22.3
  Top Layer w0.15: v1(7.25,17.645) ccw(c7.25,17.736) 7.315,17.672 cw(c7.914,17.073) 7.914,17.92 12.968,17.92 ccw(c12.968,20.81) 15.011,18.766 17.098,20.853 cw(c18.894,19.057) 18.894,21.597 25.737,21.597 cw(c25.737,21.341) CON2.15
  Bottom Layer w0.15: CON1.38 5.325,17.903 5.995,17.903 6.013,17.92 6.92,17.92 7.195,17.645 v1(7.25,17.645)
DSI_1_D3_P: CON1.36 CON2.14 | length 22.3
  Top Layer w0.15: v1(7.25,18.545) cw(c7.25,18.454) 7.315,18.518 ccw(c7.914,19.117) 7.914,18.27 12.968,18.27 ccw(c12.968,20.81) 14.764,19.014 16.85,21.1 cw(c18.894,19.057) 18.894,21.947 25.737,21.947 ccw(c25.737,22.203) CON2.14
  Bottom Layer w0.15: CON1.36 5.325,18.288 5.995,18.288 6.013,18.27 6.92,18.27 7.195,18.545 v1(7.25,18.545)
DSI_RESET#: D1.K R9.2 R10.1 TP5.1 | length 40.1
  Top Layer w0.2: D1.K 24.36,4.469 24.725,4.104 R10.1
  Top Layer w0.3: TP5.1 3.281,17.469 3.448,17.302 R9.2 4.328,16.5 4.826,16.002 4.826,10.541 8,7.367 8,3.75 10.75,1 21.5,1 22.75,2.25 22.75,5.177 23,5.427 D1.K
DSI_RESET_CON#: C8.2 CON2.22 D1.A R7.2 R10.2 T3.2 | length 45.5
  Top Layer w0.2: T3.2@14.75,34 14.75,34.5 15,34.75 v1(23,34.75) ; CON2.22 27.747,18.022 v1(27.768,18) 27.768,12.268 26.063,10.563 R7.2 R10.2 C8.2
  Bottom Layer w0.2: v1(23,34.75) 23,33.5 28.25,28.25 28.25,20.5 27.768,20.018 v1(27.768,18)
GND: C1.1 C2.1 C3.1 C4.1 C5.1 C6.1 C7.1 C8.1 CON1.3 CON1.10 CON1.16 CON1.22 CON1.28 CON1.34 CON1.40 CON1.50 CON1.55 CON1.60 CON2.1 CON2.4 CON2.7 CON2.10 CON2.13 CON2.16 CON2.31 LD1.2 pad.MH R18.1 R19.1 R28.2 R29.2 T1.1 T1.4 T2.1 T2.4 T3.1 T3.4 TP11.1 | length 41
  Top Layer w0.15: v1(13.499,36.889) 13.514,36.905 T2.1 ; v1(13.502,33.956) 13.517,33.971 T3.1@14.252,33.971 ; T3.4@15.25,35.485 15.985,35.485 v1(16,35.5) ; T2.4 15.985,38.485 v1(16,38.5)
  Top Layer w0.2: v1(9.216,7.034) R28.2 ; v1(14.25,2.75) T1.1 ; R29.2@15.5,6.5 15.5,6 15.25,5.75 T1.4 15.698,5.25 v1@15.948,5.5 ; v1(24.425,3.089) C8.1
  Top Layer w0.3: v1(14.229,13.174) R19.1 ; v1(14.359,15.891) R18.1 ; C2.1 C1.1 C3.1 ; C7.1 21.75,11.079 v1(21.75,10.25) ; TP11.1 v1(22.75,10.25) 22.75,11.089 C6.1 ; v1(24.65,25.522) CON2.7@25.868,25.522 ; v1(24.65,28.522) CON2.1@25.868,28.522 ; v1(24.7,13.522) CON2.31 ; v1(24.7,21.022) CON2.16 ; v1(24.7,22.522) CON2.13 ; v1(24.7,24.022) CON2.10 ; v1(24.7,27.022) CON2.4 ; C5.1 21.735,14.485 v1(21.75,14.5) 21.75,13.721 C5.1 ; C4.1 v1(22.75,14.5) C4.1
  Top Layer w0.4: v1(15.75,2.5) LD1.2
  Bottom Layer w0.3: CON1.60 v1(6.374,10.793) ; CON1.50 v1(6.418,13.968) ; CON1.40 v1(6.418,17.143) ; CON1.34 v1(6.418,19.048) ; CON1.28 v1(6.418,20.953) ; CON1.22 v1(6.418,22.858) ; CON1.16 v1(6.418,24.763) ; CON1.10 5.204,26.664 6.413,26.664 v1(6.416,26.66) ; v1(7.583,28.573) CON1.3 ; v1(7.63,12.063) CON1.55
  other v1: 16,5.5 20,15.5 20,16.25 20,17 20,17.75 20,18.5 12,29.5 13.5,29.5 19.25,29.5 22,29.5
GPIO_9_DSI: CON1.8 R13.1 | length 9.6
  Top Layer w0.15: R13.1@2.082,24.28 R13.1 2.051,25.301 2.5,25.75 3.5,25.75 6.244,28.494 v1(6.686,28.494)
  Bottom Layer w0.3: CON1.8 6.303,27.303 6.75,27.75 6.75,28.218 6.743,28.225 6.743,28.437 v1(6.686,28.494)
GPIO_10_DSI: CON1.56 R16.1 | length 13.4
  Top Layer w0.3: v1(6.75,12.5) 7.25,13 7.25,15.75 8.75,17.25 R16.1
  Bottom Layer w0.3: CON1.56 6.313,12.063 v1(6.75,12.5)
I2C_1_SCL: CON1.6 R1.1 | length 4.3
  Top Layer w0.3: v1(2.75,26.5) 3.455,27.206 R1.1@3.455,27.5
  Bottom Layer w0.3: v1(2.75,26.5) 4.187,27.937 CON1.6
I2C_1_SDA: CON1.4 R2.1 | length 4.7
  Top Layer w0.3: R2.1 v1(3.448,30.699)
  Bottom Layer w0.3: v1(3.448,30.699) 3.448,28.8 3.676,28.573 CON1.4
I2C_2_DSI_SCL: CON1.52 R3.1 | length 4.2
  Top Layer w0.3: R3.1@3.51,14.062 v1(3.51,15.088)
  Bottom Layer w0.3: v1(3.51,15.088) 3.51,13.76 3.938,13.333 CON1.52
I2C_2_DSI_SDA: CON1.54 R4.1 | length 4
  Top Layer w0.3: v1(3.448,11.224) R4.1
  Bottom Layer w0.3: v1(3.448,11.224) 3.448,12.198 3.948,12.698 CON1.54
I2C_DSI_SCL: CON2.20 R1.2 R3.2 TP1.1 | length 54.6
  Top Layer w0.2: R3.2 1.25,14 0.85,14.4 0.85,27.1 1.424,27.674 1.976,27.674 R1.2 2.127,27.826 2.127,28.377 2.5,28.75 4.25,28.75 TP1.1 6.5,30 7.503,31.003 25.253,31.003 27.5,28.755 27.5,19.522 27,19.022 CON2.20
I2C_DSI_SDA: CON2.21 R2.2 R4.2 TP2.1 | length 60.7
  Top Layer w0.2: R4.2 1,12.25 0.5,12.75 0.5,29.25 1,29.75 R2.2 2.051,31.489 TP2.1 6.583,31.578 6.605,31.6 25.15,31.6 25.497,31.253 ; 25.5,31.25 25.497,31.253 ; CON2.21 27,18.522 28,19.522 28,28.75 25.497,31.253
I2S_2_BCLK: CON1.42 R9.1 | length 5.1
  Top Layer w0.3: v1(1.675,17.372) 1.675,17.29 1.757,17.208 1.757,16.795 R9.1
  Bottom Layer w0.3: v1(1.675,17.372) 1.675,17.29 1.964,17.002 1.964,16.72 2.176,16.508 CON1.42
INT_DSI#: CON2.19 R6.2 R13.2 TP7.1 | length 38.9
  Top Layer w0.15: R6.2 3.249,23.499 3.418,23.668 3.418,24.22 R13.2
  Top Layer w0.2: R13.2 3.448,24.948 5.803,27.303 8.053,27.303 TP7.1 11.255,30.505 25.255,30.505 27,28.76 27,19.75 26.772,19.522 CON2.19
IO_VREF: C1.2 CON2.24 R6.1 R7.1 R8.2 R12.2 TP4.1 | length 63.9
  Top Layer w0.3: R6.1 2.436,20.75 TP4.1 ; C1.2 21.678,17.022 23.25,17.022 CON2.24 ; v1(22.5,6.5) 23,6.5 23.25,6.75 R7.1
  Top Layer w0.5: v1(11.5,8.375) 11.5,10.5 12.35,11.35 R8.2 R8.2@12.355,13.291 ; v1@12.544,12.206 13,11.75 R12.2
  POWER w0.8: v1@2.5,21.965 2.5,17.742 2.525,17.717 2.525,10.5 4.65,8.375 v1(11.5,8.375) 12.125,8.375 v1(12.5,8) v1(13.25,7.25) 14,6.5 v1(22.5,6.5) 23.25,6.5 25.75,9 25.75,15 23.5,17.25 v1(22.5,17.25)
  other v1: 12.483,12.146 23.25,17 2.518,21.965
NetLD1_1: LD1.1 R11.1 | length 1
  Top Layer w0.4: LD1.1 R11.1@19.5,2.5
NetLD2_1: LD2.1 R22.1 | length 8.5
  Top Layer w0.15: R22.1 12.406,33.594 13.25,32.75 18,32.75 18.5,33.25 LD2.1@18.5,34
NetLD2_2: LD2.2 T3.3 | length 1.8
  Top Layer w0.15: T3.3 16.96,33.96 LD2.2@17,34
NetLD3_1: LD3.1 R23.1 | length 1
  Top Layer w0.4: LD3.1 R23.1@19.5,5
NetLD3_2: LD3.2 T1.6 | length 3.6
  Top Layer w0.2: T1.6 14.25,4.75 14.5,4.5 15.75,4.5 16.25,5 LD3.2
NetLD4_1: LD4.1 R24.1 | length 1
  Top Layer w0.4: LD4.1 R24.1@19.5,3.75
NetLD4_2: LD4.2 T1.3 | length 1.8
  Top Layer w0.2: T1.3@15.25,3.75 LD4.2
NetLD5_1: LD5.1 R26.1 | length 8.2
  Top Layer w0.2: R26.1@12.457,38.879 13.06,38.879 13.682,39.5 17.5,39.5 18.5,38.5 LD5.1
NetLD5_2: LD5.2 T2.3 | length 1.8
  Top Layer w0.15: T2.3 16.155,36.905 16.25,37 LD5.2
NetR21_2: R21.2 T3.5 T3.6 | length 2.4
  Top Layer w0.15: R21.2 13.5,35.75 13.75,35.5 T3.5@14.75,35.5
NetR25_2: R25.2 T2.5 T2.6 | length 2.6
  Top Layer w0.15: R25.2@12.392,37.895 13.145,37.895 13.735,38.485 T2.6 T2.5
NetR27_2: R27.2 R29.1 T1.5 | length 2.3
  Top Layer w0.2: T1.5 R27.2@14.75,7.5
PWM_3_DSI: CON1.58 R15.1 | length 15.1
  Top Layer w0.3: v1(7.25,11) 8.25,11 8.5,11.25 8.5,15.25 9.75,16.5 12,16.5 13.967,14.533 R15.1
  Bottom Layer w0.3: CON1.58 6.822,11.428 v1(7.25,11)
PWM_3_DSI_CON: CON2.18 R15.2 R19.2 TP8.1 | length 14.9
  Top Layer w0.2: R19.2 R15.2 17.033,14.533 18.25,15.75 TP8.1 18.25,18.25 19.9,19.9 24.816,19.9 24.938,20.022 CON2.18
PWR_DN#: CON2.17 R16.2 R18.2 T2.2 TP10.1 | length 45.8
  Top Layer w0.15: T2.2 14.759,36.896 14.759,36.491 15,36.25 16.25,36.25 17,35.5 v1(19.75,35.5) ; T2.2@14.75,37 14.759,36.991 T2.2@14.759,36.905
  Top Layer w0.2: R18.2 16.249,17.199 R16.2 16.377,17.429 16.377,17.877 TP10.1 19,20.5 v1(19.5,20.5) 20.75,20.5 21,20.25 24.671,20.25 24.943,20.522 CON2.17
  Bottom Layer w0.2: v1(19.5,20.5) 20.5,20.5 21,20 26.75,20 27.5,20.75 27.5,28 20.077,35.423 19.827,35.423 v1(19.75,35.5) 20.077,35.5
pads on no net: CON1. CON1.1 CON1.2 CON1.5 CON1.7 CON1.9 CON1.11 CON1.13 CON1.15 CON1.17 CON1.29 CON1.41 CON1.44 CON1.46 CON1.48 CON1.53 CON1.57 CON1.59 CON2. CON2.0 CON2.32 CON2.33 CON2.34 CON2.S1 CON2.S2 FID1.1 FID2.1 FID3.1 FID4.1

## Polygon pours and split planes (outlines as drawn)
+V1.8_SW_DSI on Top Layer "+V1.8_SW_DSI_L01_P018" (solid, pour order 18): 9.5,10.75 9.5,9.25 9.75,9 9.75,7.5 9.75,6.25 9.25,5.75 8.75,5.75 8.5,5.5 8.5,5 8.75,4.75 10.75,4.75 11,5 11,5.5 10.5,6 10.5,10.75
IO_VREF on Top Layer "IO_VREF_L01_P017" (solid, pour order 17): 12,13.75 12,11.5 11.25,10.75 11,10.5 11,8.25 12.75,6.5 13.5,6.5 13.75,6.75 13.75,7.5 12,9.25 12,10.5 12.75,11.25 14.5,11.25 14.5,12.25 13.25,12.25 13,12.5 13,13.75
+V1.8_SW on Top Layer "+V1.8_SW_L01_P015" (solid, pour order 15): 11.43,12.795 10.689,12.054 10.689,11.144 9.606,11.144 9.5,11.25 9.5,12.706 10.16,13.366 10.16,15.462 10.541,15.843 11.43,15.843 11.684,15.589 11.684,14.573 11.43,14.319
+V3.3_SW_DSI on Top Layer "S+V3.3_SW_DSI_L01_P016" (solid, pour order 16): 13.262,10.819 12.762,10.319 12.762,9.319 13.262,8.819 14.262,8.819 14.512,9.069 14.512,10.569 14.262,10.819
GND on Top Layer "GND_L01_P012" (solid, pour order 12): 23.278,10.219 23.024,9.965 21.5,9.965 21.246,10.219 21.246,11.108 21.5,11.362 23.024,11.362 23.278,11.108
GND on Top Layer "GND_L01_P002" (solid, pour order 2): 21.209,14.605 21.463,14.859 22.987,14.859 23.241,14.605 23.241,13.716 22.987,13.462 21.463,13.462 21.209,13.716
no net on Top Layer "NONET_L01_P011" (solid, pour order 11): 21.5,14.75 21.25,14.5
+V5_SW on Top Layer "+V5_SW_L01_P010" (solid, pour order 10): 17.25,10.75 17.75,10.25 18.801,10.25 19.25,10.699 19.25,13.5 18.75,14 17.75,14 17.25,13.5
+V5_SW_DSI on Top Layer "+V5_SW_DSI_L01_P008" (solid, pour order 8): 20.884,13.66 19.961,13.66 19.75,13.513 19.75,10.5 20.75,10.5 21,10.75 21,11.348 21.336,11.684 23.114,11.684 24.257,12.827 24.257,13.843 24.384,13.97 25.171,13.97 25.273,13.868 26.543,13.868 26.594,13.919 26.594,16.129 26.543,16.18 26.518,16.154 24.892,16.154 23.622,14.884 23.622,13.614 23.165,13.157 21.387,13.157
+V3.3_SW_DSI on Top Layer "+V3.3_SW_DSI_L01_P007" (solid, pour order 7): 24.188,16.688 23.4,15.9 21.463,15.9 21.387,15.824 21.387,15.215 21.463,15.138 23.638,15.138 24.858,16.358 26.543,16.358 26.594,16.408 26.594,16.662 26.568,16.688
IO_VREF on Top Layer "IO_VREF_L01_P006" (solid, pour order 6): 23.597,17.17 23.114,17.653 21.438,17.653 21.387,17.602 21.387,16.739 21.625,16.5 23.5,16.5 23.866,16.866 26.568,16.866 26.594,16.891 26.594,17.145 26.568,17.17
+V1.8_SW_DSI on Top Layer "+V1.8_SW_DSI_L01_P005" (solid, pour order 5): 24.257,17.678 23.927,18.009 23.927,18.364 23.241,19.05 21.539,19.05 21.412,18.923 21.412,18.161 21.539,18.034 23.165,18.034 23.825,17.374 26.568,17.374 26.594,17.399 26.594,17.653 26.568,17.678
GND on Top Layer "GND_L01_P004" (solid, remove dead copper, pour order 4): 19.5,18.5 20.004,19.004 20.996,19.004 21,18.856 21,15.174 19.826,15.174 19.5,15.5
+V1.8_SW on Bottom Layer "+V1.8_SW_L04_P014" (solid, pour order 14): 10.16,12.675 11.705,12.705 12.116,13.157 12.116,15.57 11.608,16.078 7.976,16.078 7.976,13.157 8.001,13.132 9.703,13.132
+V3.3_SW on Bottom Layer "+V3.3_SW_L04_P013" (solid, pour order 13): 8.001,19.888 8.001,16.967 8.026,16.942 9.601,16.942 11.201,18.542 13.843,18.542 15.113,17.272 15.113,9.388 15.875,9.388 15.875,17.907 13.894,19.888 8.331,19.888
+V5_SW on Bottom Layer "+V5_SW_L04_P009" (solid, pour order 9): 18,10.5 18.5,11 18.5,20 14.802,23.698 8.026,23.698 8.001,23.673 8.001,20.752 8.026,20.726 14.024,20.726 17,17.75 17,11 17.5,10.5
GND on GND "GND_L02_P000" (solid, pour order 0): 31,40 cw(c31,36) 35,36 35,4 cw(c31,4) 31,0 4,0 cw(c4,4) 0,4 0,36 cw(c4,36) 4,40
GND on POWER "GND_L03_P001" (solid, pour order 1): 31,40 cw(c31,36) 35,36 35,4 cw(c31,4) 31,0 4,0 cw(c4,4) 0,4 0,36 cw(c4,36) 4,40

## Other copper
GND:
  pour cut-out: 6.8,23.36 ccw(c7.25,23.36) 7.7,23.36 7.7,24.26 ccw(c7.25,24.26) 6.8,24.26
  pour cut-out: 6.8,21.455 ccw(c7.25,21.455) 7.7,21.455 7.7,22.355 ccw(c7.25,22.355) 6.8,22.355
  pour cut-out: 6.8,19.55 ccw(c7.25,19.55) 7.7,19.55 7.7,20.45 ccw(c7.25,20.45) 6.8,20.45
  pour cut-out: 6.8,17.645 ccw(c7.25,17.645) 7.7,17.645 7.7,18.545 ccw(c7.25,18.545) 6.8,18.545
POWER:
  pour cut-out: 6.8,25.265 ccw(c7.25,25.265) 7.7,25.265 7.7,26.165 ccw(c7.25,26.165) 6.8,26.165
  pour cut-out: 6.8,23.36 ccw(c7.25,23.36) 7.7,23.36 7.7,24.26 ccw(c7.25,24.26) 6.8,24.26
  pour cut-out: 6.8,21.455 ccw(c7.25,21.455) 7.7,21.455 7.7,22.355 ccw(c7.25,22.355) 6.8,22.355
  pour cut-out: 6.8,19.55 ccw(c7.25,19.55) 7.7,19.55 7.7,20.45 ccw(c7.25,20.45) 6.8,20.45
  pour cut-out: 6.8,17.645 ccw(c7.25,17.645) 7.7,17.645 7.7,18.545 ccw(c7.25,18.545) 6.8,18.545

## Silkscreen, mask and mechanical layers (free items; w line width, h text height)
Top Overlay:
  text "DSI to DSI Adapter Rev-0.00" at 34.234,9.25 h1.5 r90
Mechanical 1:
  lines w0.2: 0,3.75 0,36 cw(c4,36) 4,40 31,40 cw(c31,36) 35,36 35,4 cw(c31,4) 31,0 4,0 cw(c4,4) 0,4

## Text inside footprints (layer, text, board x,y; h text height)
LD1: Mechanical 14 "K" at 16.95,2.7 h1 r180
LD2: Mechanical 14 "K" at 16.95,34.168 h1 r180
LD3: Mechanical 14 "K" at 16.95,5.2 h1 r180
LD4: Mechanical 14 "K" at 16.95,3.95 h1 r180
LD5: Mechanical 14 "K" at 16.95,37.2 h1 r180